# Altium PCB 0.PCB1.PcbDoc (part 9 of 12)
Units mm, origin at the board's own origin, x right, y up, seen from the top; angles counter-clockwise.
Board outline 77 x 72 mm, 6 copper layers (Top Layer, Layer 1, Layer 3, Layer 4, Layer 2, Bottom Layer), stack 1.538 mm thick; 570 components, 490 nets, 3331 pads, 1909 vias.
Unrouted connection lines stored in the file: 2.
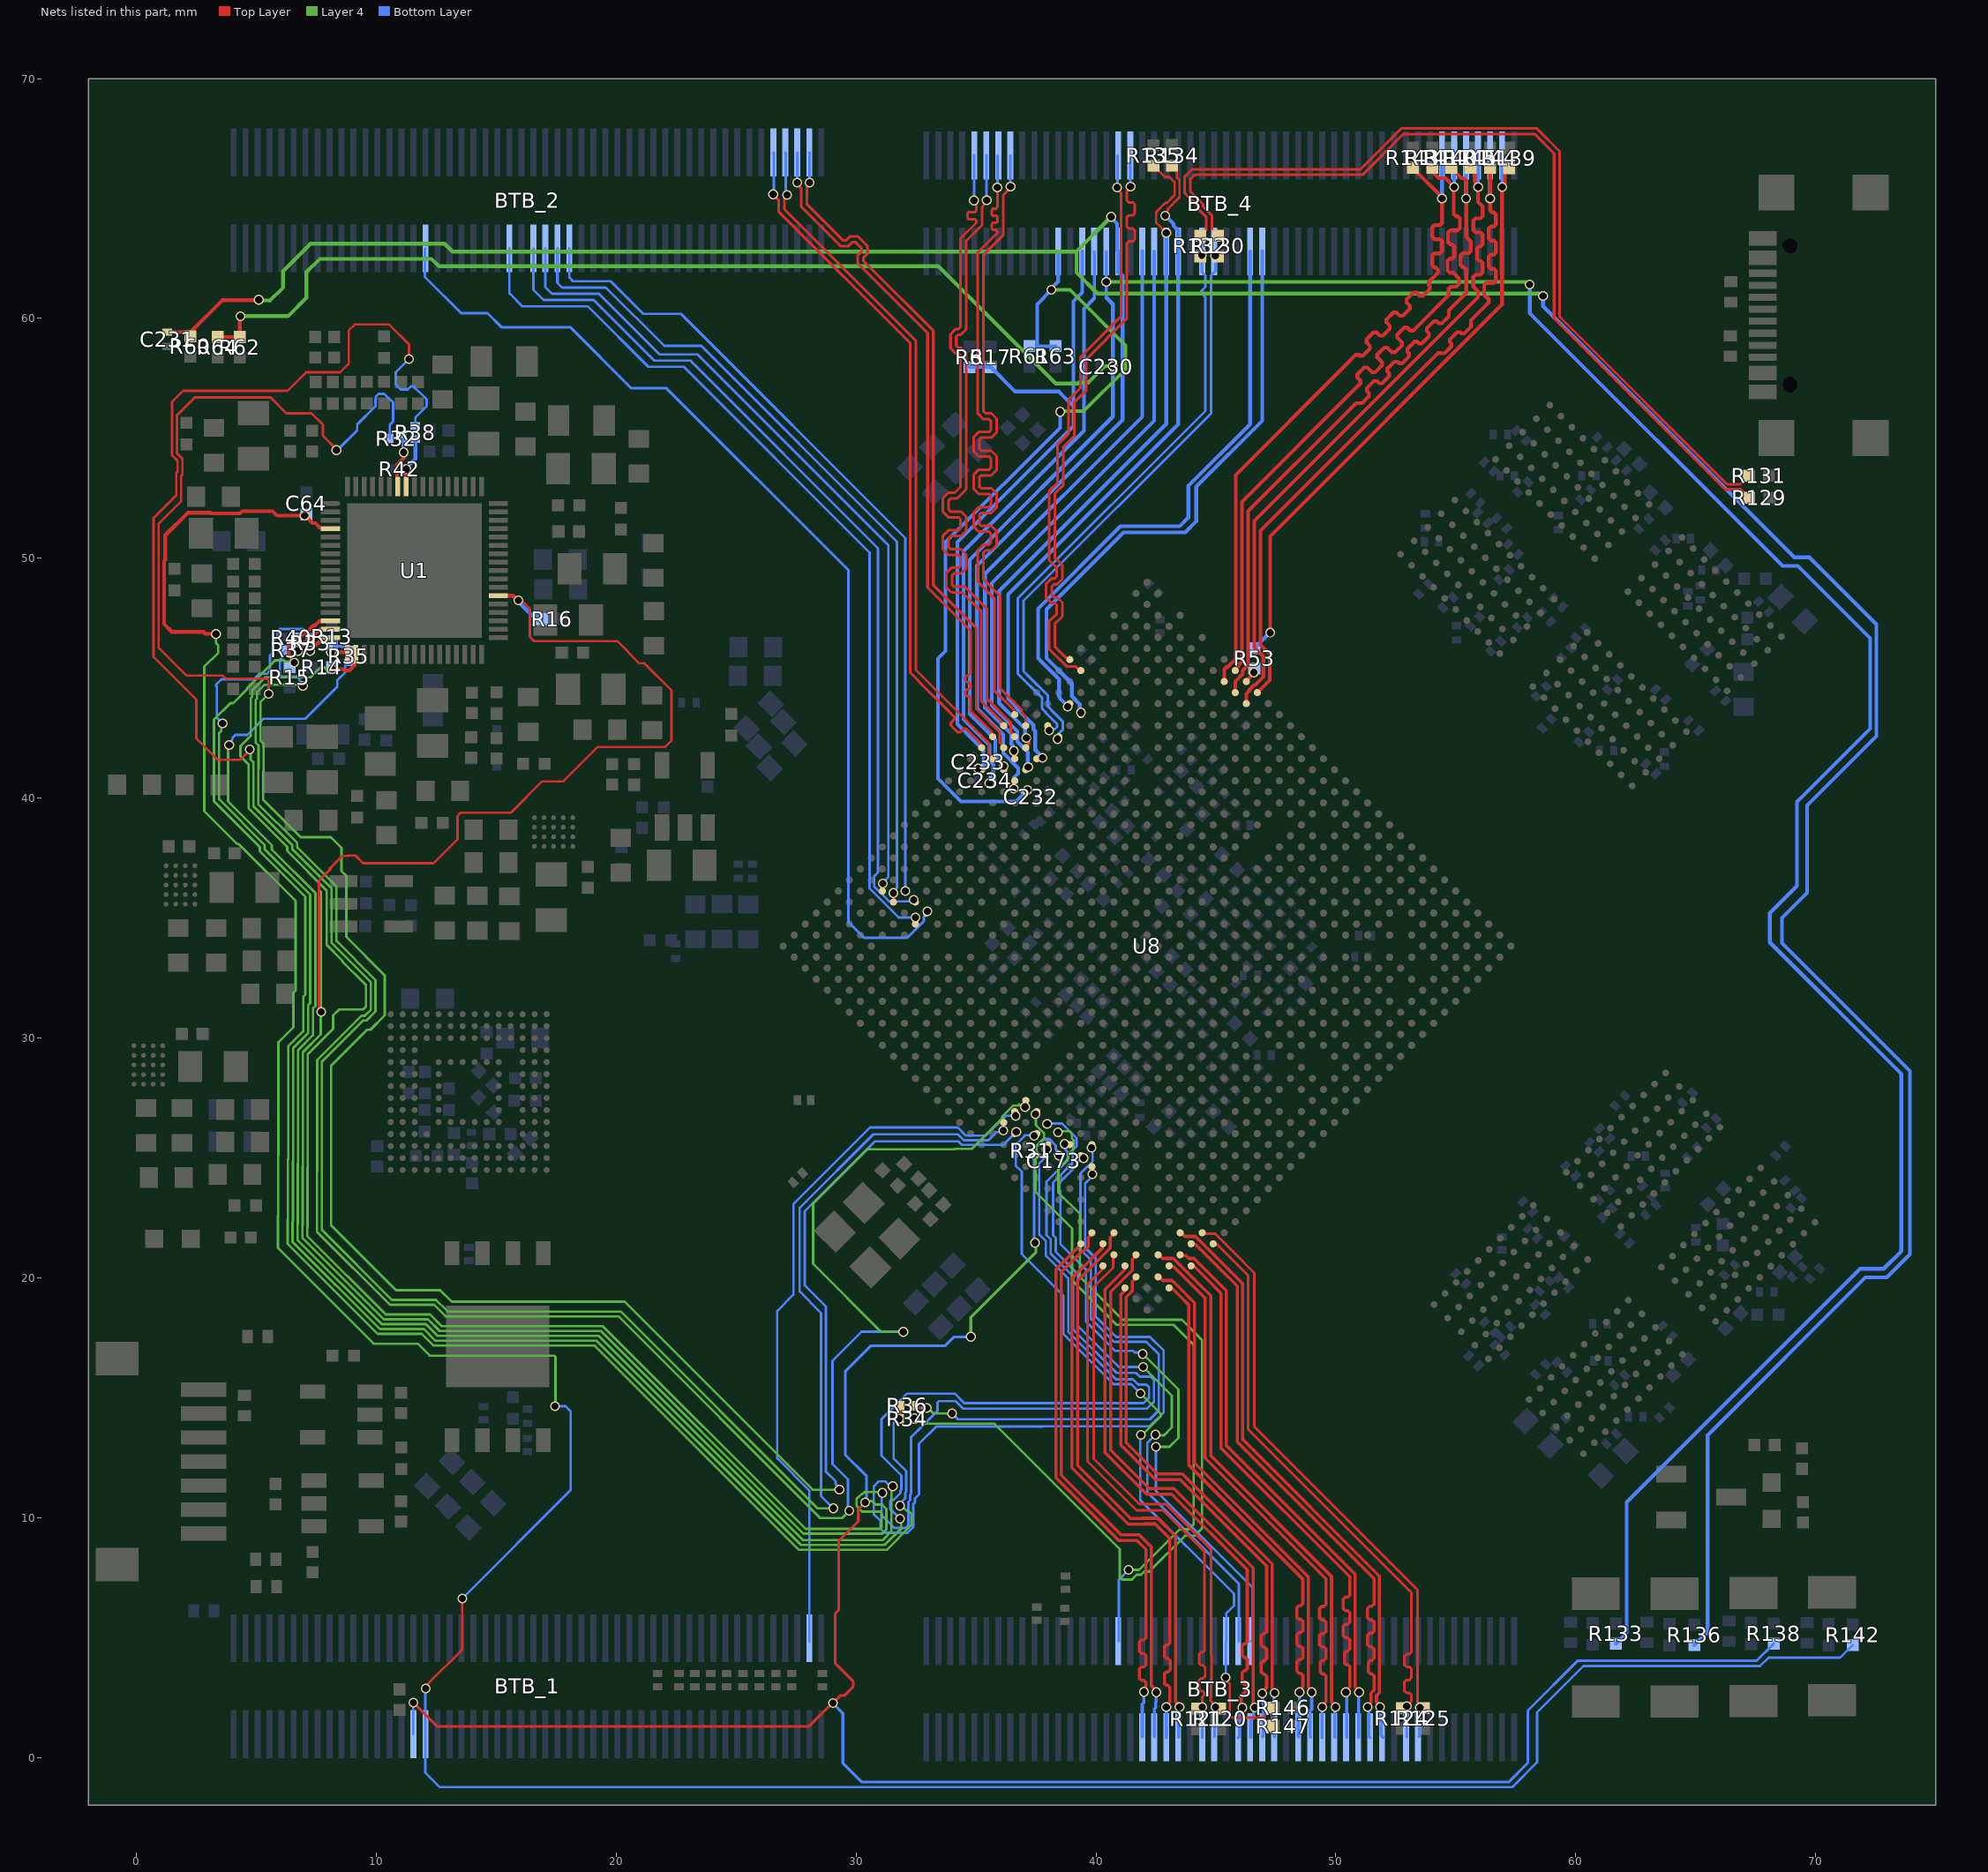
[diagram p13: the nets of this part, all layers, seen from the top]

## Via types
v1: diameter 0.41, hole 0.3, Top Layer to Bottom Layer, tented both sides, 1901 vias
v2: diameter 0.41, hole 0.3, Top Layer to Bottom Layer, 8 vias

## Nets (pads, with @x,y where several pads share a name; then routed paths per layer and width w, separated by ;. In a path a pad name is that pad's centre, name@x,y a point inside that pad or via, vN(x,y) a via of type N, cw(c..) or ccw(c..) an arc to the next point about the centre after c; other vN are vias at no path point) (continued)
PCIE30_PORT0_REF_CLKN: BTB_3.77 R121.2 U8.E34 | length 23.3
  Top Layer w0.109: U8.E34@40.292,20.497 40.256,20.46 40.256,20.331 39.816,19.891 39.648,19.723 39.648,12.348 41.69,10.305 42.808,10.305 44.531,8.583 44.531,5.436 44.531,4.461 44.449,4.38 44.377,4.38 44.296,4.298 44.296,3.92 44.377,3.839 44.47,3.839 44.551,3.758 44.551,3.379 44.47,3.298 44.377,3.298 44.296,3.217 44.296,2.838 44.377,2.757 44.449,2.757 44.531,2.676 44.531,2.622 44.432,2.523 v1(44.432,2.102)
  Bottom Layer w0.109: BTB_3.77@44.429,0.817 v1@44.429,2.095
PCIE30_PORT0_REF_CLKP: BTB_3.76 R120.2 U8.E33 | length 23.2
  Top Layer w0.109: U8.E33@40.752,20.956 40.715,20.919 40.715,20.421 40.001,19.707 39.909,19.615 39.909,12.456 41.799,10.567 42.916,10.567 44.792,8.691 44.792,4.262 44.813,4.241 44.813,3.271 44.792,3.25 44.792,2.513 44.775,2.496 44.775,2.376 44.983,2.168 v1(44.983,2.104)
  Bottom Layer w0.109: BTB_3.76@44.955,0.843 v1@44.955,2.076
PCIE30_PORT0_RX0N: BTB_3.82 U8.G34 | length 23.7
  Top Layer w0.131: U8.G34@39.373,21.416 39.373,21.378 38.328,20.333 38.328,11.671 40.95,9.049 41.707,9.049 42.082,8.673 42.082,5.068 42.082,4.983 41.998,4.899 41.9,4.899 41.816,4.814 41.816,4.42 41.9,4.336 41.998,4.336 42.082,4.252 42.082,3.858 41.998,3.773 41.9,3.773 41.816,3.689 41.816,3.295 41.9,3.211 41.998,3.211 42.082,3.126 42.082,3.061 42.082,2.948 42.056,2.922 42.056,2.785 v1(42.003,2.732)
  Bottom Layer w0.131: BTB_3.82@41.931,0.867 41.931,2.217 41.99,2.277 41.99,2.72 v1(42.003,2.732)
PCIE30_PORT0_RX0P: BTB_3.81 U8.G33 | length 23.7
  Top Layer w0.131: U8.G33@39.832,21.875 39.832,21.83 39.748,21.745 39.748,21.74 39.68,21.672 39.68,21.289 39.5,21.109 39.433,21.109 39.015,20.692 38.56,20.237 38.56,11.767 41.047,9.281 41.803,9.281 42.315,8.769 42.315,2.982 42.514,2.783 v1(42.514,2.714)
  Bottom Layer w0.131: BTB_3.81@42.431,0.867 42.431,2.01 42.49,2.07 42.49,2.286 42.514,2.309 v1(42.514,2.714)
PCIE30_PORT0_RX1N: BTB_3.80 U8.F33 | length 24.1
  Top Layer w0.131: U8.F33@40.292,21.416 40.26,21.383 40.26,21.227 39.44,20.407 39.432,20.407 39,19.976 39,12.075 41.349,9.726 42.029,9.726 42.035,9.732 42.476,9.732 43.086,9.123 43.086,5.167 43.086,4.775 43.001,4.69 42.937,4.69 42.852,4.606 42.852,4.212 42.937,4.128 43.01,4.128 43.094,4.043 43.094,3.65 43.01,3.565 42.937,3.565 42.852,3.481 42.852,3.087 42.937,3.003 43.001,3.003 43.086,2.918 43.086,2.853 43.086,2.318 42.932,2.164 v1(42.932,2.102)
  Bottom Layer w0.131: BTB_3.80@42.929,0.817 v1@42.929,2.095
PCIE30_PORT0_RX1P: BTB_3.79 U8.F32 | length 24.1
  Top Layer w0.131: U8.F32@40.752,21.875 40.751,21.829 40.599,21.677 40.599,21.237 39.535,20.173 39.239,19.877 39.239,12.174 41.448,9.965 41.93,9.965 41.936,9.971 42.575,9.971 43.324,9.222 43.324,8.935 43.327,8.933 43.327,2.32 43.483,2.163 v1(43.483,2.104)
  Bottom Layer w0.131: BTB_3.79@43.455,0.843 v1@43.455,2.076
PCIE30_PORT0_TX0N: BTB_3.74 U8.D33 | length 23.7
  Top Layer w0.131: U8.D33@41.19,20.399 41.19,20.319 40.38,19.509 40.38,12.713 42.116,10.977 43.155,10.977 46.309,7.823 46.309,4.984 46.309,4.818 46.225,4.734 46.18,4.734 46.095,4.649 46.095,4.255 46.18,4.171 46.225,4.171 46.309,4.087 46.309,3.693 46.225,3.608 46.18,3.608 46.095,3.524 46.095,3.13 46.18,3.046 46.225,3.046 46.309,2.961 46.309,2.896 46.309,2.815 46.004,2.51 46.051,2.463 46.051,2.127 v1(46.104,2.074)
  Bottom Layer w0.131: BTB_3.74@45.929,0.817 45.98,0.868 45.98,1.787 46.051,1.857 46.051,2.02 v1(46.104,2.074)
PCIE30_PORT0_TX0P: BTB_3.73 U8.D32 | length 23.7
  Top Layer w0.131: U8.D32@41.671,20.956 41.671,20.91 41.518,20.757 41.518,20.318 40.613,19.413 40.613,19.095 40.613,12.809 42.213,11.209 43.251,11.209 46.561,7.899 46.561,2.55 ; 46.562,2.549 46.562,2.137 v1(46.616,2.083)
  Bottom Layer w0.131: BTB_3.73@46.455,0.843 46.455,1.518 46.581,1.644 46.581,2.048 v1(46.616,2.083)
PCIE30_PORT0_TX1N: BTB_3.72 U8.C34 | length 22.5
  Top Layer w0.131: U8.C34@41.211,19.577 41.179,19.545 41.179,19.432 41.032,19.284 41.032,13.028 42.473,11.587 43.506,11.587 47.118,7.974 47.118,5.505 47.118,5.24 47.034,5.155 46.979,5.155 46.894,5.071 46.894,4.677 46.979,4.593 47.034,4.593 47.118,4.508 47.118,4.114 47.034,4.03 46.979,4.03 46.894,3.946 46.894,3.552 46.979,3.467 47.034,3.467 47.118,3.383 47.118,3.318 47.118,2.919 46.933,2.734 v1(46.933,2.675)
  Bottom Layer w0.131: v1(46.933,2.675) 46.935,2.674 46.935,2.29 46.988,2.237 46.988,0.916 BTB_3.72@46.935,0.863
PCIE30_PORT0_TX1P: BTB_3.71 U8.C33 | length 22.5
  Top Layer w0.131: U8.C33@41.671,20.037 41.671,19.991 41.518,19.838 41.518,19.442 41.264,19.188 41.264,13.125 42.57,11.819 43.602,11.819 47.35,8.07 47.35,2.867 47.452,2.766 v1(47.452,2.69)
  Bottom Layer w0.131: BTB_3.71@47.443,0.855 47.443,1.771 47.427,1.787 47.427,2.665 v1(47.452,2.69)
PCIE30_PORT1_REF_CLKN: BTB_3.59 R125.2 U8.B28 | length 25.1
  Top Layer w0.109: U8.B28@44.429,21.875 44.465,21.839 44.965,21.839 45.681,21.123 46.605,20.2 46.605,13.785 53.411,6.978 53.411,2.302 53.511,2.202 R125.2@53.511,2.132
  Bottom Layer w0.109: BTB_3.59@53.455,0.843 53.483,0.871 53.483,2.104 v1@53.511,2.132
  other v1: 53.511,2.081
PCIE30_PORT1_REF_CLKP: BTB_3.60 R124.2 U8.A28 | length 24.9
  Top Layer w0.109: U8.A28@44.888,21.416 44.925,21.379 45.056,21.379 46.343,20.092 46.343,13.676 53.15,6.87 53.15,4.987 53.15,4.392 53.069,4.31 52.943,4.31 52.862,4.229 52.862,3.851 52.943,3.77 53.069,3.77 53.15,3.689 53.15,3.31 53.069,3.229 52.943,3.229 52.862,3.148 52.862,2.769 52.943,2.688 53.069,2.688 53.15,2.607 53.15,2.344 53.093,2.288 52.96,2.154 v1(52.96,2.13)
  Bottom Layer w0.109: BTB_3.60@52.955,0.843 52.957,0.845 52.957,2.123 v1@52.955,2.125
PCIE30_PORT1_RX0N: BTB_3.69 U8.A32 | length 22.1
  Top Layer w0.131: U8.A32@43.049,19.577 43.082,19.545 43.187,19.545 43.645,19.087 43.713,19.019 43.878,18.854 43.878,12.18 48.627,7.431 48.627,7.034 48.627,6.406 48.542,6.321 48.457,6.321 48.373,6.237 48.373,5.843 48.457,5.759 48.542,5.759 48.627,5.674 48.627,5.281 48.542,5.196 48.457,5.196 48.373,5.112 48.373,4.718 48.457,4.634 48.542,4.634 48.627,4.549 48.627,4.155 48.542,4.071 48.457,4.071 48.373,3.987 48.373,3.593 48.457,3.508 48.542,3.508 48.627,3.424 48.627,2.931 48.503,2.807 48.487,2.791 v1(48.487,2.716)
  Bottom Layer w0.131: BTB_3.69@48.455,0.843 48.435,0.862 48.435,2.151 48.493,2.209 48.493,2.71 v1(48.487,2.716)
PCIE30_PORT1_RX0P: BTB_3.68 U8.B32 | length 22.1
  Top Layer w0.131: U8.B32@42.59,20.037 42.636,20.037 42.788,19.884 43.177,19.884 43.356,19.704 43.741,19.319 43.809,19.251 44.11,18.951 44.11,12.276 48.859,7.527 48.859,7.034 48.859,2.931 48.999,2.791 v1(48.999,2.716)
  Bottom Layer w0.131: BTB_3.68@48.955,0.843 48.935,0.862 48.935,1.944 48.993,2.002 48.993,2.71 v1(48.999,2.716)
PCIE30_PORT1_RX1N: BTB_3.67 U8.B31 | length 23.5
  Top Layer w0.131: U8.B31@43.05,20.496 43.082,20.464 43.239,20.464 44.062,19.64 44.13,19.572 44.553,19.149 44.553,12.483 49.59,7.447 49.59,7.004 49.59,6.376 49.505,6.292 49.408,6.292 49.324,6.207 49.324,5.813 49.408,5.729 49.505,5.729 49.59,5.645 49.59,5.251 49.505,5.166 49.408,5.166 49.324,5.082 49.324,4.688 49.408,4.604 49.505,4.604 49.59,4.519 49.59,4.126 49.505,4.041 49.438,4.041 49.353,3.957 49.353,3.563 49.438,3.479 49.505,3.479 49.59,3.394 49.59,3.206 49.59,2.318 49.432,2.16 v1(49.432,2.102)
  Bottom Layer w0.131: BTB_3.67@49.429,0.817 v1@49.429,2.095
PCIE30_PORT1_RX1P: BTB_3.66 U8.C31 | length 23.4
  Top Layer w0.131: U8.C31@42.59,20.956 42.636,20.956 42.789,20.803 43.228,20.803 44.295,19.737 44.786,19.245 44.786,12.58 49.822,7.543 49.822,7.004 49.822,2.32 49.983,2.159 v1(49.983,2.104)
  Bottom Layer w0.131: BTB_3.66@49.955,0.843 v1@49.955,2.076
PCIE30_PORT1_TX0N: BTB_3.65 U8.A30 | length 23.5
  Top Layer w0.131: U8.A30@43.969,20.497 44.001,20.464 44.106,20.464 44.496,20.074 44.564,20.006 45.206,19.364 45.206,12.909 50.581,7.534 50.581,7.392 50.581,6.764 50.496,6.68 50.397,6.68 50.312,6.596 50.312,6.202 50.397,6.117 50.496,6.117 50.581,6.033 50.581,5.639 50.496,5.555 50.397,5.555 50.312,5.47 50.312,5.077 50.397,4.992 50.496,4.992 50.581,4.908 50.581,4.514 50.496,4.43 50.44,4.43 50.356,4.345 50.356,3.951 50.44,3.867 50.496,3.867 50.581,3.783 50.581,3.414 50.581,2.932 50.421,2.772 v1(50.421,2.716)
  Bottom Layer w0.131: v1(50.421,2.716) 50.455,2.682 BTB_3.65@50.455,0.843
PCIE30_PORT1_TX0P: BTB_3.64 U8.B30 | length 23.5
  Top Layer w0.131: U8.B30@43.509,20.956 43.542,20.924 43.755,20.924 43.875,20.803 44.096,20.803 44.729,20.17 45.439,19.461 45.439,13.005 50.813,7.631 50.813,7.392 50.813,2.932 50.972,2.772 v1(50.972,2.716)
  Bottom Layer w0.131: BTB_3.64@50.955,0.843 50.952,0.846 50.952,2.695 v1(50.972,2.716)
PCIE30_PORT1_TX1N: BTB_3.63 U8.B29 | length 24.9
  Top Layer w0.131: U8.B29@43.969,21.416 44.001,21.383 44.158,21.383 45.05,20.492 45.122,20.419 45.889,19.652 45.889,13.155 51.59,7.455 51.59,7.008 51.59,6.38 51.505,6.296 51.409,6.296 51.324,6.211 51.324,5.817 51.409,5.733 51.505,5.733 51.59,5.649 51.59,5.255 51.505,5.17 51.409,5.17 51.324,5.086 51.324,4.692 51.409,4.608 51.505,4.608 51.59,4.523 51.59,4.13 51.505,4.045 51.435,4.045 51.351,3.961 51.351,3.567 51.435,3.483 51.505,3.483 51.59,3.398 51.59,3.219 51.59,2.798 51.465,2.673 51.465,2.315 51.327,2.177 v1(51.327,2.102)
  Bottom Layer w0.131: v1(51.327,2.102) 51.379,2.05 51.379,0.868 BTB_3.63@51.429,0.817
PCIE30_PORT1_TX1P: BTB_3.62 U8.C29 | length 24.9
  Top Layer w0.131: U8.C29@43.509,21.875 43.555,21.875 43.708,21.722 44.148,21.722 45.214,20.656 45.355,20.515 46.122,19.748 46.122,13.251 51.822,7.551 51.822,7.008 51.822,2.702 51.697,2.577 51.697,2.32 51.838,2.179 v1(51.838,2.104)
  Bottom Layer w0.131: v1(51.838,2.104) 51.885,2.057 51.885,0.913 BTB_3.62@51.955,0.843
PCIE30X1_0_CLKREQN_M0: BTB_1.49 U8.T31 | length 30.1
  Bottom Layer w0.102: BTB_1.49@28.051,4.843 28.051,11.131 26.715,12.467 26.715,18.616 27.388,19.289 27.388,23.066 30.583,26.261 33.446,26.261 34.24,26.261 34.575,25.926 35.409,25.926 36.237,26.754 v1(36.65,26.754)
PCIE30X1_0_PERSTN_M0: BTB_3.27 U8.P30 | length 27.8
  Layer 4 w0.102: v1(41.97,16.279) 43.167,15.083 43.167,13.758 42.841,13.433 42.504,13.433 v1(42.479,13.458)
  Bottom Layer w0.102: v1(37.968,26.413) 37.987,26.432 38.581,26.432 39.186,25.827 39.186,25.476 39.013,25.302 39.013,25.218 39.035,25.195 39.035,24.917 39.013,24.895 39.013,24.767 38.216,23.97 38.216,21.768 38.322,21.662 38.322,21.081 39.253,20.15 39.253,17.985 40.959,16.279 v1(41.97,16.279) ; v1(42.479,13.458) 42.141,13.12 42.141,11.053 45.955,7.239 BTB_3.27@45.955,4.843
PCIE30X1_0_WAKEN_M0: BTB_3.17 U8.R30 | length 28.2
  Layer 4 w0.102: v1(37.475,26.819) 37.499,26.794 37.499,26.364 37.835,26.028 37.835,25.811 37.476,25.452 37.476,23.584 39.006,22.054 39.006,19.894 40.865,18.034 41.673,18.034 42.593,18.034 43.243,18.034 44.073,17.204 44.073,9.718 43.868,9.513 43.494,9.513 ; v1(41.367,7.817) 41.799,7.817 43.494,9.513 ; 43.492,9.515 43.494,9.513
  Bottom Layer w0.102: BTB_3.17@40.955,4.843 40.955,7.405 v1(41.367,7.817)
PCIE30X2_CLKREQN_M1: BTB_2.73 U8.AL27 | length 35.2
  Top Layer w0.127: U8.AL27@31.559,35.664 v1(31.559,36.041)
  Bottom Layer w0.102: 17.546,61.491 17.749,61.288 19.57,61.288 22.006,58.852 23.547,58.852 31.706,50.693 31.706,39.66 31.706,36.255 31.559,36.107 v1(31.559,36.041)
  Bottom Layer w0.114: 17.546,61.491 17.551,61.497 BTB_2.73@17.551,62.92
PCIE30X2_PERSTN_M1: BTB_2.75 U8.AK26 | length 36.6
  Bottom Layer w0.102: 16.551,61.69 16.551,61.19 16.977,60.765 19.059,60.765 21.584,58.24 23.093,58.24 30.914,50.419 30.914,38.867 30.914,36.896 30.756,36.739 30.756,36.312 31.374,35.694 32.339,35.694 v1(32.398,35.753)
  Bottom Layer w0.114: 16.551,61.69 BTB_2.75@16.551,62.92
PCIE30X2_WAKEN_M1: BTB_2.74 U8.AM27 | length 34.6
  Bottom Layer w0.102: 17.051,61.606 17.051,61.3 17.325,61.026 19.283,61.026 21.81,58.499 23.385,58.499 31.351,50.534 31.351,39.304 31.351,36.714 31.118,36.482 v1(31.118,36.441)
  Bottom Layer w0.114: 17.051,61.606 BTB_2.74@17.051,62.92
PCIE30X4_CLKREQN_M1: BTB_2.72 U8.AL26 | length 34.4
  Bottom Layer w0.102: BTB_2.72@18.051,62.92 18.051,61.697 18.196,61.552 19.767,61.552 21.13,60.189 22.701,60.189 32.053,50.837 v1(32.053,36.123)
PCIE30X4_PERSTN_M1: BTB_2.77 U8.AJ27 | length 37.8
  Bottom Layer w0.102: BTB_2.77@15.551,62.92 15.551,61.047 16.098,60.501 18.826,60.501 21.343,57.983 22.816,57.983 30.563,50.236 30.563,38.517 30.563,36.232 31.774,35.021 v1(32.479,35.021)
PCIE30X4_WAKEN_M1: BTB_2.84 U8.AJ26 | length 42.8
  Bottom Layer w0.114: BTB_2.84@12.051,62.92 12.028,62.897 12.028,61.729 13.537,60.219 14.638,60.219 15.222,59.634 18.087,59.634 20.636,57.086 22.099,57.086 29.679,49.505 29.679,37.633 29.679,34.825 30.331,34.174 32.131,34.174 32.833,34.875 32.833,35.047 32.979,35.193 v1(32.979,35.273)
PMIC_INT: R14.2 U1.19 U8.M30 | length 95.3
  Top Layer w0.156: v1(8.161,45.371) 8.628,45.371 8.679,45.32 8.876,45.32 9.119,45.562 9.119,45.967 U1.19@9.14,45.988
  Layer 4 w0.102: v1(8.161,45.371) 8.159,45.373 7.912,45.373 7.835,45.45 7.677,45.45 7.263,45.037 5.364,45.037 4.827,44.5 4.827,44.228 4.766,44.166 4.766,42.591 4.341,42.166 4.341,41.743 4.674,41.41 4.674,39.579 6.283,37.97 6.283,37.794 7.934,36.142 7.934,33.873 8.586,33.222 8.586,33.187 9.57,32.202 9.57,31.308 9.449,31.187 8.451,31.187 8.202,30.939 8.202,30.375 7.143,29.316 7.143,24.594 7.132,24.582 7.132,22.092 7.121,22.082 7.121,21.745 10.399,18.467 12.239,18.467 12.726,17.981 19.443,17.981 27.897,9.527 31.005,9.527 31.065,9.587 31.065,10.192 31.005,10.251 30.252,10.251 30.024,10.479 30.024,10.775 30.233,10.984 30.262,10.984 30.34,11.062 31.064,11.062 v1(31.096,11.03)
  Bottom Layer w0.102: v1(31.096,11.03) 31.074,11.008 31.074,10.087 31.595,9.566 32.066,9.566 32.186,9.686 32.186,10.651 32.258,10.723 32.258,10.952 32.292,10.986 32.292,13.345 33.398,14.45 33.398,14.795 33.457,14.854 34.144,14.854 34.455,14.543 42.129,14.543 42.419,14.833 42.419,15.749 42.29,15.878 41.828,15.878 41.676,16.03 40.861,16.03 39.05,17.841 39.05,20.066 38.119,20.996 38.119,21.592 37.939,21.772 37.939,24.009 38.82,24.889 38.82,24.975 38.842,24.997 38.842,25.115 38.82,25.138 38.82,25.244 38.753,25.31 38.753,25.517 v1(38.694,25.576)
PMIC_PWR_CTRL1: R32.2 U1.62 | length 2.1
  Top Layer w0.156: U1.62@10.89,52.989 10.869,53.01 10.869,53.53 10.848,53.55 10.848,53.885 11.153,54.191 11.153,54.409 v1(11.146,54.416)
  Bottom Layer w0.102: R32.2@11.115,54.989 11.109,54.983 11.109,54.542 v1@11.145,54.506
PMIC_PWR_CTRL1_R: R32.1 U8.R32 | length 104
  Top Layer w0.102: v1(5.516,44.342) 5.516,44.895 5.43,44.981 3.727,44.981 3.602,45.106 2.09,45.106 0.922,46.274 0.922,51.426 1.86,52.364 1.86,53.426 1.92,53.485 1.92,54.148 1.688,54.379 1.688,55.96 2.433,56.704 5.598,56.704 6.257,56.046 7.299,56.046 7.615,55.73 7.654,55.691 7.655,55.69 7.658,55.69 7.719,55.629 7.719,55.618 7.778,55.559 7.778,55.104 8.337,54.545 v1(8.337,54.506)
  Layer 4 w0.102: v1(5.516,44.342) 5.172,43.998 5.172,42.402 5.299,42.275 5.299,41.126 5.284,41.11 5.284,39.933 6.849,38.368 8.106,38.368 8.554,37.92 8.554,36.95 8.747,36.757 8.747,34.21 10.355,32.602 10.355,30.94 9.754,30.339 9.614,30.339 8.119,28.843 8.119,22.185 10.82,19.483 12.66,19.483 13.146,18.997 20.356,18.997 28.192,11.161 v1(29.304,11.161)
  Bottom Layer w0.102: v1(8.337,54.506) 8.376,54.506 9.201,55.331 9.201,55.575 9.967,56.341 9.967,56.625 9.981,56.64 9.981,56.744 10.093,56.856 10.337,56.856 10.697,56.496 10.697,56.446 10.699,56.444 10.699,55.703 10.565,55.57 R32.1@10.565,54.989 ; v1(29.304,11.161) 29.304,11.245 29.149,11.399 29.149,11.508 28.747,11.91 28.747,18.794 27.864,19.676 27.864,22.766 30.786,25.687 34.268,25.687 34.415,25.54 36.141,25.54 36.682,26.081 v1(36.682,26.085)
PMIC_PWR_CTRL2: R38.2 R42.2 U1.61 | length 2.1
  Top Layer w0.156: U1.61@11.24,52.989 11.247,52.995 11.247,53.712 v1(11.253,53.718)
  Bottom Layer w0.156: v1(11.253,53.718) 11.253,53.768 11.627,54.143 11.627,54.938 R38.2@11.602,54.963
PMIC_PWR_CTRL2_R: R38.1 U8.T30 | length 113.9
  Top Layer w0.102: v1(4.719,42.029) 4.719,41.985 4.327,41.593 3.4,41.593 2.501,42.492 2.501,44.102 0.719,45.885 0.719,51.675 1.657,52.613 1.657,53.55 1.716,53.609 1.716,54.064 1.485,54.295 1.485,56.515 1.947,56.978 6.301,56.978 7.073,57.75 7.162,57.75 ; 7.162,57.751 7.943,57.751 7.949,57.757 8.321,57.757 8.327,57.751 8.494,57.751 8.849,58.105 8.849,59.5 9.095,59.746 10.536,59.746 11.361,58.922 v1(11.361,58.311)
  Layer 4 w0.102: v1(4.719,42.029) 4.764,41.983 4.764,41.608 4.877,41.495 4.877,39.663 6.5,38.041 6.5,37.864 8.137,36.227 8.137,33.958 9.776,32.319 9.776,31.18 9.514,30.918 9.374,30.918 7.539,29.083 7.539,24.429 7.528,24.418 7.528,21.914 10.568,18.874 12.408,18.874 12.894,18.387 20.103,18.387 28.511,9.98 29.418,9.98 v1(29.723,10.286) ; v1(31.973,17.743) 31.041,17.743 28.208,20.575 28.208,23.082 30.486,25.359 34.114,25.359 34.124,25.37 34.219,25.37 34.224,25.374 34.832,25.374 36.103,26.645 36.103,26.726 36.556,27.179 36.75,27.179 36.8,27.229 36.851,27.179 36.991,27.179 v1(37.05,27.12)
  Bottom Layer w0.102: v1(11.361,58.311) 10.81,57.76 10.81,57.245 11.019,57.036 11.315,57.036 11.455,57.176 11.539,57.176 11.783,56.931 11.798,56.931 12.1,56.629 12.1,56.333 11.627,55.861 R38.1@11.627,55.518 ; v1(29.723,10.286) 29.664,10.345 29.664,10.496 29.661,10.499 29.661,11.584 29.019,12.227 29.019,16.541 30.228,17.75 31.917,17.75 v1@31.95,17.783
PMIC_PWR_CTRL3: R37.2 R40.2 U1.16 | length 2.3
  Top Layer w0.156: v1(6.737,46.138) 6.737,46.195 7.145,46.602 7.213,46.602 7.627,47.017 8.069,47.017 U1.16@8.09,47.039
  Bottom Layer w0.156: R40.2@6.735,46.696 6.735,46.14 v1(6.737,46.138)
PMIC_PWR_CTRL3_R: R37.1 U8.T32 | length 79.2
  Layer 4 w0.102: v1(6.94,44.679) 6.9,44.719 5.334,44.719 5.031,44.416 5.031,44.144 4.969,44.082 4.969,42.318 5.096,42.191 5.096,41.21 5.081,41.195 5.081,39.747 6.703,38.125 6.703,37.948 8.341,36.311 8.341,34.042 9.969,32.414 9.969,31.1 9.594,30.725 9.454,30.725 7.732,29.003 7.732,21.996 10.652,19.077 12.492,19.077 12.978,18.591 20.187,18.591 28.394,10.384 v1(29.057,10.384)
  Bottom Layer w0.102: R37.1@6.213,46.15 6.082,46.018 6.082,45.882 5.981,45.782 5.981,45.508 5.981,45.155 6.07,45.066 6.689,45.066 6.791,44.964 6.791,44.912 6.94,44.763 v1(6.94,44.679) ; v1(29.057,10.384) 28.544,10.897 28.544,18.527 27.652,19.419 27.652,22.914 30.72,25.982 33.725,25.982 34.246,25.982 34.495,25.733 35.521,25.733 35.863,26.075 36.077,26.075 v1(36.143,26.142)
PMIC_SPI_CLK: R33.2 U1.17 | length 1.1
  Top Layer w0.156: v1(7.249,46.138) 7.249,46.147 7.768,46.667 8.069,46.667 U1.17@8.09,46.689
PMIC_SPI_CLK_R: R33.1 U8.N31 | length 92.2
  Layer 4 w0.102: v1(3.593,43.113) 3.534,43.054 3.534,42.79 3.449,42.705 3.449,39.942 5.354,38.037 5.354,37.861 7.242,35.972 7.242,31.445 7.158,31.361 7.158,30.193 6.534,29.568 6.534,24.846 6.522,24.835 6.522,22.345 6.512,22.335 6.512,21.493 10.147,17.858 11.987,17.858 12.473,17.371 19.19,17.371 27.706,8.856 31.196,8.856 31.879,9.539 31.879,9.897 v1(31.829,9.947)
  Bottom Layer w0.102: v1(3.593,43.113) 3.352,43.354 3.352,44.633 3.331,44.655 3.331,44.739 3.543,44.951 4.884,44.951 5.112,45.179 5.44,45.179 5.575,45.314 5.575,45.95 5.675,46.051 5.675,46.515 5.879,46.718 5.879,46.959 5.968,47.048 6.944,47.048 7.033,46.959 7.033,46.912 7.204,46.742 R33.1@7.254,46.742 ; v1(31.829,9.947) 31.421,10.355 31.421,10.685 31.48,10.745 31.571,10.745 31.852,11.026 31.852,11.12 31.886,11.154 31.886,11.756 31.063,12.578 31.063,14.1 32.133,15.169 34.117,15.169 34.51,14.776 41.991,14.776 42.216,15.001 42.216,15.434 42.106,15.544 41.771,15.544 41.549,15.766 40.837,15.766 38.846,17.757 38.846,19.981 37.916,20.912 37.916,21.522 37.639,21.799 37.639,24.769 37.892,25.023 37.892,25.298 v1(37.951,25.357)
PMIC_SPI_CS: R13.2 R35.2 U1.18 | length 1.4
  Top Layer w0.156: v1(8.116,46.084) 8.769,46.084 8.79,46.062 U1.18@8.79,45.988
  Bottom Layer w0.102: R13.2@8.224,46.327 8.564,46.327 8.596,46.295 8.76,46.295 R35.2@8.859,46.196
PMIC_SPI_CS_R: R35.1 U8.K30 | length 92.3
  Layer 4 w0.102: v1(3.866,42.213) 3.823,42.171 3.823,39.855 5.643,38.036 5.643,37.859 7.462,36.04 7.462,31.327 7.361,31.226 7.361,30.108 6.737,29.484 6.737,24.762 6.725,24.75 6.725,22.261 6.715,22.25 6.715,21.577 10.231,18.061 12.071,18.061 12.557,17.575 19.274,17.575 27.79,9.059 31.112,9.059 31.471,9.418 31.471,11.245 v1(31.529,11.302)
  Bottom Layer w0.102: v1(3.866,42.213) 3.866,42.297 4.001,42.432 4.001,42.512 4.126,42.637 4.627,42.637 5.298,43.308 7.037,43.308 8.375,44.646 8.375,44.912 8.71,45.246 8.71,45.547 8.728,45.565 R35.1@8.916,45.565 ; v1(31.529,11.302) 31.445,11.302 31.346,11.401 31.325,11.401 31.217,11.509 30.957,11.509 30.738,11.291 30.738,10.135 31.02,9.853 31.02,9.525 31.183,9.363 32.151,9.363 32.389,9.602 32.389,10.567 32.462,10.639 32.462,10.804 32.628,10.971 32.628,13.074 33.349,13.795 37.793,13.795 37.805,13.807 42.249,13.807 42.825,14.383 42.825,16.956 42.252,17.529 40.845,17.529 39.991,18.383 39.991,20.812 39.55,21.253 39.55,23.928 39.849,24.227 v1(39.849,24.317)
PMIC_SPI_MOSI: R15.2 R34.2 R36.2 U1.15 | length 68.6
  Top Layer w0.102: R34.2@31.859,14.123 R34.2@31.869,14.113 ; R34.2@31.866,14.232 31.866,14.793 R36.2@31.868,14.794
  Top Layer w0.156: v1(6.577,45.647) 6.577,45.715 6.352,45.94 6.352,46.322 6.578,46.547 6.661,46.547 6.975,46.861 7.053,46.861 7.377,47.184 7.43,47.184 7.612,47.367 8.069,47.367 U1.15@8.09,47.389
  Layer 4 w0.102: v1(6.577,45.647) 6.522,45.701 6.2,45.701 6.158,45.743 5.783,45.743 4.624,44.585 4.624,44.546 4.042,43.964 3.924,43.964 3.236,43.276 3.236,39.868 5.15,37.953 5.15,37.777 7.039,35.888 7.039,31.802 6.955,31.718 6.955,30.277 6.33,29.653 6.33,24.93 6.319,24.919 6.319,22.429 6.309,22.419 6.309,21.409 10.063,17.655 11.903,17.655 12.389,17.168 19.106,17.168 27.621,8.653 31.281,8.653 32.316,9.688 32.316,10.153 32.189,10.28 32.117,10.28 31.899,10.497 v1(31.829,10.497)
  Bottom Layer w0.102: v1@31.79,14.174 31.569,13.953 31.569,12.457 32.089,11.936 32.089,11.07 32.055,11.036 32.055,10.807 31.829,10.581 v1(31.829,10.497)
  other v1: 31.791,14.12
PMIC_SPI_MOSI_R1: R34.1 U8.N30 | length 37.7
  Top Layer w0.102: R34.1@32.408,14.115 32.408,14.12 v1(32.423,14.136)
  Layer 4 w0.102: v1@32.43,14.245 32.763,13.912 35.765,13.912 40.99,8.687 40.99,7.516 41.091,7.415 41.498,7.415 41.697,7.614 41.883,7.614 42.014,7.745 42.217,7.745 43.713,9.241 44.114,9.241 44.424,9.551 44.424,17.404 43.583,18.245 42.803,18.245 41.462,18.245 41.112,18.245 39.331,20.026 39.331,22.655 38.44,23.546 38.44,24.56 38.82,24.94 38.82,24.975 38.831,24.986 38.831,25.143 38.879,25.191 38.896,25.191 39.061,25.356 39.061,25.744 38.993,25.813 38.993,26.017 38.899,26.111 38.462,26.111 v1(38.417,26.065)
PMIC_SPI_MOSI_R2: R36.1 U8.L29 | length 23.9
  Top Layer w0.102: R36.1@32.415,14.664 32.515,14.565 v1(32.946,14.565)
  Layer 4 w0.102: v1@32.979,14.544 33.019,14.544 33.225,14.339 v1(34.002,14.339)
  Bottom Layer w0.102: v1(34.002,14.339) 34.241,14.1 42.255,14.1 42.622,14.467 42.622,16.807 42.103,17.326 40.761,17.326 39.788,18.299 39.788,20.742 39.357,21.173 39.357,24.345 39.634,24.622 39.643,24.622 39.858,24.837 39.858,25.375 v1(39.815,25.418)
PWR_ON: BTB_1.84 C64.2 R142.2 U1.4 | length 138.6
  Top Layer w0.102: v1@12.085,2.995 12.087,2.995 12.175,3.083 12.175,3.086 13.583,4.494 v1(13.583,6.627)
  Top Layer w0.156: v1(3.316,46.839) 3.306,46.849 2.877,46.849 2.798,46.927 1.475,46.927 1.152,47.249 1.152,49.889 1.203,49.94 1.203,50.955 2.145,51.898 3.093,51.898 3.123,51.868 4.311,51.868 4.407,51.964 5.68,51.964 5.869,51.775 v1(7.013,51.775) 7.035,51.775 7.349,51.46 7.46,51.46 7.66,51.26 8.069,51.26 U1.4@8.09,51.239
  Layer 4 w0.102: v1(3.316,46.839) 3.316,46.457 3.413,46.36 3.413,46.061 2.83,45.478 2.83,39.453 4.203,38.08 4.272,38.08 6.633,35.72 6.633,31.97 6.548,31.886 6.548,30.445 5.924,29.821 5.924,25.099 5.912,25.087 5.912,22.597 5.902,22.587 5.902,21.24 9.894,17.248 11.734,17.248 12.231,16.752 17.41,16.752 17.469,16.692 17.469,14.656 v1(17.454,14.641)
  Bottom Layer w0.102: v1@12.044,2.858 12.044,0.988 12.048,0.984 12.048,-0.639 12.651,-1.241 57.353,-1.241 58.389,-0.205 58.389,1.877 60.319,3.808 67.685,3.808 68.041,4.163 71.032,4.163 R142.2@71.555,4.686 ; v1(13.583,6.627) 18.104,11.148 18.104,14.425 17.889,14.641 v1(17.454,14.641)
  other v1: 12.058,2.872
RECOVERY_KEY: BTB_4.84 C231.1 R60.1 R136.2 U8.AL16 | length 160.5
  Top Layer w0.156: C231.1@1.29,59.429 2.075,59.429 2.153,59.351 R60.1@2.153,59.281 ; R60.1@2.306,59.485 3.578,60.757 5.075,60.757 v1(5.1,60.781)
  Layer 4 w0.156: v1(5.1,60.781) 5.134,60.747 5.54,60.747 5.557,60.73 6.116,61.288 6.116,61.974 7.259,63.117 12.847,63.117 13.177,62.787 39.186,62.787 ; v1(40.634,64.234) 39.186,62.787 ; v1(58.643,60.932) 58.574,60.932 58.473,61.034 40.063,61.034 39.186,61.91 39.186,62.787
  Bottom Layer w0.156: v1(36.585,40.394) 36.585,40.85 36.765,41.03 36.765,41.249 36.138,41.875 36.138,42.644 35.046,43.737 35.046,49.695 41.115,55.764 41.115,61.78 41.023,61.871 40.978,61.871 40.931,61.918 BTB_4.84@40.931,62.793 40.884,62.84 40.884,63.945 40.634,64.195 v1(40.634,64.234) ; v1(58.643,60.932) 58.643,60.511 69.118,50.036 69.743,50.036 72.535,47.243 72.535,42.58 69.647,39.692 69.647,36.047 68.6,34.999 68.6,33.958 73.934,28.624 73.934,20.978 72.968,20.013 72.079,20.013 65.501,13.434 65.501,5.236 R136.2@64.951,4.686
RESETn: BTB_1.85 C173.2 R16.2 R31.1 R138.2 U1.40 U8.M31 | length 179.6
  Top Layer w0.102: v1(7.708,31.082) 7.614,31.176 7.614,36.563 8.098,37.047 8.043,37.047 8.583,37.587 8.816,37.587 8.834,37.606 9.13,37.606 9.451,37.285 12.387,37.285 13.383,38.281 13.383,39.254 13.517,39.388 15.605,39.388 16.916,40.699 17.805,40.699 19.237,42.131 22.044,42.131 22.306,42.393 22.306,44.49 21.174,45.621 20.97,45.621 20.045,46.546 16.571,46.546 16.399,46.718 16.399,47.897 v1@16.05,48.246
  Top Layer w0.114: v1@11.571,2.258 12.536,1.293 28.036,1.293 29.001,2.258 v1(29.035,2.258) 29.358,2.581 29.523,2.581 29.88,2.938 29.88,3.172 29.137,3.915 29.137,6.001 29.278,6.142 29.278,9.022 30.096,9.84 30.096,10.336 30.381,10.621 v1(30.381,10.627)
  Top Layer w0.156: U1.40@15.091,48.439 15.696,48.439 15.888,48.246 v1(15.923,48.246) ; v1@15.97,48.246 v1@16.05,48.246
  Layer 4 w0.102: 7.688,36.101 7.688,30.148 6.94,29.4 6.94,24.678 6.928,24.666 6.928,22.176 6.918,22.166 6.918,21.661 10.315,18.264 12.155,18.264 12.641,17.778 19.359,17.778 27.813,9.323 31.089,9.323 31.268,9.502 31.268,10.354 31.086,10.536 30.813,10.536 30.661,10.688 30.659,10.686 30.44,10.686 v1(30.381,10.627)
  Layer 4 w0.114: v1(34.788,17.54) 34.788,18.35 37.502,21.064 37.502,21.42 v1(37.467,21.456)
  Bottom Layer w0.102: BTB_1.85@11.535,0.98 v1@11.535,2.282
  Bottom Layer w0.114: v1(29.035,2.258) 29.035,2.249 29.454,1.831 29.454,-0.248 30.238,-1.032 57.207,-1.032 58.008,-0.231 58.008,1.954 60.091,4.036 67.552,4.036 R138.2@68.253,4.737 ; v1(30.381,10.627) 30.438,10.684 30.438,10.837 30.442,10.842 30.442,11.721 29.547,12.617 29.547,16.091 30.624,17.168 33.718,17.168 34.083,17.533 34.781,17.533 v1(34.788,17.54) ; v1(37.467,21.456) 37.429,21.493 37.429,24.87 37.44,24.881 37.44,25.066 R31.1@37.476,25.102 ; R31.1@37.51,25.22 37.511,25.221 37.511,25.45 37.84,25.779 38.057,25.779 38.324,25.511 38.324,25.351 38.453,25.223 v1(38.453,25.092)
  Bottom Layer w0.156: v1(15.923,48.246) 15.923,48.18 16.475,47.628 16.734,47.628 R16.2@16.906,47.457
  other v1: 11.541,2.288
RTC_INT: BTB_3.28 U8.L30 | length 25.7
  Layer 4 w0.102: v1(41.955,16.823) 43.436,15.342 43.436,13.32 43.062,12.947 v1(42.499,12.947)
  Bottom Layer w0.102: v1(39.486,24.989) 39.408,24.989 39.206,24.786 39.206,24.687 38.515,23.996 38.515,23.968 38.485,23.938 38.485,23.65 38.515,23.621 38.515,21.414 39.585,20.345 39.585,18.167 40.804,16.947 41.547,16.947 41.611,16.883 41.896,16.883 v1(41.955,16.823) ; v1(42.499,12.947) 42.499,11.118 46.527,7.089 46.527,4.915 BTB_3.28@46.455,4.843
SARADC_IN0_BOOT: BTB_4.85 C230.1 R62.1 R64.2 R133.2 U8.AM16 | length 156.9
  Top Layer w0.156: R64.2@3.398,59.224 R62.1@4.261,59.224 ; R62.1@4.261,59.307 4.312,59.358 v1@4.312,60.12
  Layer 4 w0.156: v1(4.338,60.094) 6.319,60.094 7.089,60.864 7.089,61.928 7.644,62.483 12.303,62.483 12.61,62.177 33.435,62.177 38.328,57.284 39.252,57.284 39.285,57.318 39.674,57.318 40.367,58.011 v1(40.71,58.011) ; v1(40.434,61.519) 57.915,61.519 58.015,61.419 v1(58.084,61.419)
  Bottom Layer w0.127: 40.431,60.872 40.431,61.516 v1(40.434,61.519) 40.432,61.521 40.432,62.792 BTB_4.85@40.431,62.793
  Bottom Layer w0.156: v1(36.159,41.325) 36.159,41.393 35.946,41.606 35.946,41.624 35.944,41.624 35.808,41.76 35.808,42.441 34.741,43.508 34.741,49.937 40.71,55.906 v1(40.71,58.011) 40.71,60.592 40.431,60.872 ; v1@58.084,61.44 v1(58.084,61.419) 58.084,60.221 68.625,49.68 69.26,49.68 72.275,46.665 72.275,42.896 69.223,39.844 69.223,36.334 68.092,35.202 68.092,33.983 73.578,28.497 73.578,21.105 72.841,20.369 71.851,20.369 62.123,10.64 62.123,5.185 R133.2@61.675,4.737
SARADC_IN2: BTB_4.89 C232.1 R61.1 R63.2 U8.AK16 | length 35.3
  Layer 4 w0.142: v1(38.145,61.186) 38.926,61.186 41.234,58.878 41.234,57.872 39.49,56.128 38.524,56.128 v1(38.505,56.109)
  Bottom Layer w0.142: v1(37.143,40.333) 36.666,39.855 34.378,39.855 33.422,40.812 33.422,45.821 33.734,46.134 33.734,50.672 38.505,55.442 v1(38.505,56.109) ; 37.549,58.843 R63.2@38.323,58.843
  Bottom Layer w0.156: 37.549,58.843 37.549,60.591 v1(38.145,61.186) 38.145,61.265 38.431,61.55 BTB_4.89@38.431,62.793
SARADC_IN3: BTB_4.87 C233.1 R6.1 R17.2 U8.AN17 | length 29.4
  Bottom Layer w0.156: R6.1@34.73,57.97 R17.2@35.614,57.97 36.634,56.95 38.461,56.95 39.062,56.349 ; v1(35.091,41.229) 35.249,41.229 C233.1@35.344,41.325 ; C233.1@35.309,41.289 C233.1@35.344,41.325 ; BTB_4.87@39.431,62.793 39.431,61.078 39.062,60.708 39.062,56.349 ; C233.1@35.344,41.325 35.344,41.426 35.309,41.461 35.309,42.001 34.678,42.632 34.606,42.704 34.225,43.084 34.225,50.668 39.062,55.504 39.062,56.349
SARADC_IN4: BTB_4.86 C234.1 U8.AM17 | length 25
  Bottom Layer w0.127: 39.931,60.833 BTB_4.86@39.931,62.793
  Bottom Layer w0.156: v1(35.56,40.621) 35.57,40.621 35.726,40.777 35.726,41.395 35.56,41.561 35.56,42.207 34.907,42.86 34.483,43.283 34.483,50.296 39.504,55.316 39.504,60.406 39.931,60.833
SDMMC_CLK: BTB_4.49 R53.2 R139.1 | length 25.8
  Top Layer w0.156: v1(47.263,46.895) 47.263,50.914 56.931,60.582 56.931,65.469 v1(56.941,65.479) ; v1@56.916,65.479 56.916,65.533 57.049,65.666 57.049,66.095 R139.1@57.22,66.266
  Bottom Layer w0.156: R53.2@46.603,46.251 47.248,46.895 v1(47.263,46.895) ; BTB_4.49@56.931,66.793 56.936,66.788 56.936,65.484 v1(56.941,65.479)
SDMMC_CLK_R: R53.1 U8.AE1 | length 0.5
  Top Layer w0.156: U8.AE1@46.267,44.856 46.267,44.886 46.59,45.209 v1(46.59,45.238)
SDMMC_CMD: BTB_4.46 R140.1 U8.AE2 | length 30.1
  Top Layer w0.156: U8.AE2@45.807,44.397 45.807,44.864 46.127,45.184 46.127,45.322 46.186,45.381 46.186,45.392 46.342,45.548 46.342,51.967 50.369,55.994 50.84,56.465 50.97,56.465 50.972,56.463 51.097,56.463 51.388,56.754 51.388,56.878 51.297,56.969 51.297,57.094 51.589,57.385 51.713,57.385 51.804,57.294 51.929,57.294 52.22,57.586 52.22,57.71 52.15,57.78 52.15,57.905 52.441,58.196 52.566,58.196 52.636,58.126 52.761,58.126 53.052,58.418 53.052,58.542 52.982,58.612 52.982,58.737 53.273,59.028 53.398,59.028 53.468,58.958 53.593,58.958 53.884,59.25 53.884,59.374 53.793,59.465 53.793,59.59 54.084,59.881 54.209,59.881 54.3,59.79 54.425,59.79 54.716,60.081 54.716,60.206 54.714,60.209 54.714,60.338 55.019,60.644 55.442,61.067 55.442,61.96 55.442,62.038 55.351,62.13 55.29,62.13 55.202,62.218 55.202,62.63 55.29,62.718 55.534,62.718 55.622,62.806 55.622,63.218 55.534,63.306 55.442,63.398 55.442,64.732 55.442,64.987 v1(55.428,65.002) 55.428,65.747 55.332,65.843 55.237,65.843 54.884,66.197 R140.1@54.884,66.292
  Bottom Layer w0.156: v1(55.428,65.002) BTB_4.46@55.427,66.797
SDMMC_D0: BTB_4.47 R145.1 U8.AD2 | length 29.5
  Top Layer w0.156: U8.AD2@46.267,43.937 46.267,44.347 46.407,44.487 46.407,44.529 46.594,44.716 46.637,44.716 46.984,45.064 46.984,45.898 46.6,46.282 46.6,51.551 55.931,60.882 55.931,61.062 55.931,61.14 55.839,61.232 55.825,61.232 55.737,61.32 55.737,61.732 55.825,61.82 56.032,61.82 56.12,61.908 56.12,62.32 56.032,62.408 55.969,62.408 55.88,62.497 55.88,62.908 55.969,62.997 56.032,62.997 56.12,63.085 56.12,63.497 56.032,63.585 55.825,63.585 55.737,63.673 55.737,64.085 55.825,64.173 56.032,64.173 56.12,64.261 56.12,64.673 56.032,64.761 56.022,64.761 55.931,64.853 55.931,65.45 55.931,65.479 v1(55.936,65.484) 55.936,65.563 55.792,65.707 55.792,66.12 R145.1@55.595,66.317
  Bottom Layer w0.156: v1@55.931,65.489 BTB_4.47@55.931,66.793
SDMMC_D1: BTB_4.48 R144.1 U8.AD1 | length 29.8
  Top Layer w0.156: U8.AD1@46.727,44.397 47.242,44.912 47.242,46.005 46.858,46.389 46.858,51.149 53.788,58.079 54.259,58.55 54.389,58.55 54.399,58.54 54.524,58.54 54.815,58.831 54.815,58.956 54.763,59.008 54.763,59.133 55.054,59.424 55.179,59.424 55.231,59.372 55.356,59.372 55.647,59.663 55.647,59.788 55.636,59.798 55.636,59.928 55.87,60.162 56.3,60.591 56.378,60.669 56.378,60.799 56.287,60.891 56.277,60.891 56.189,60.979 56.189,61.391 56.277,61.479 56.584,61.479 56.673,61.567 56.673,61.979 56.584,62.067 56.466,62.067 56.378,62.155 56.378,62.567 56.466,62.656 56.584,62.656 56.673,62.744 56.673,63.156 56.584,63.244 56.466,63.244 56.378,63.332 56.378,63.744 56.466,63.832 56.584,63.832 56.673,63.92 56.673,64.332 56.584,64.42 56.522,64.42 56.431,64.512 56.431,64.983 56.431,64.994 v1(56.433,64.996) 56.433,66.241 R144.1@56.458,66.266
  Bottom Layer w0.156: BTB_4.48@56.431,66.793 56.432,66.792 v1(56.433,64.996) v1(56.433,64.996)
SDMMC_D2: BTB_4.44 R143.1 U8.AF2 | length 30.3
  Top Layer w0.156: U8.AF2@45.348,44.856 45.348,45.364 45.439,45.456 45.48,45.456 45.826,45.802 45.826,53.472 50.365,58.012 50.837,58.483 50.966,58.483 51.005,58.444 51.13,58.444 51.421,58.736 51.421,58.86 51.283,58.999 51.283,59.124 51.574,59.415 51.699,59.415 51.837,59.276 51.962,59.276 52.253,59.567 52.253,59.692 52.114,59.831 52.114,59.956 52.406,60.247 52.53,60.247 52.669,60.108 52.794,60.108 53.085,60.399 53.085,60.524 52.946,60.663 52.946,60.788 53.238,61.079 53.362,61.079 53.501,60.94 53.626,60.94 53.917,61.231 53.917,61.356 53.878,61.395 53.878,61.525 53.984,61.631 54.177,61.824 54.256,61.902 54.256,62.032 54.164,62.123 54.112,62.123 54.023,62.212 54.023,62.623 54.112,62.712 54.34,62.712 54.428,62.8 54.428,63.212 54.34,63.3 54.112,63.3 54.023,63.388 54.023,63.8 54.112,63.888 54.336,63.888 54.428,63.98 54.428,64.661 v1(54.428,65.002) ; R143.1@53.207,66.273 54.426,65.054 v1@54.426,65.002
  Bottom Layer w0.156: v1@54.427,65.003 BTB_4.44@54.427,66.797
SDMMC_D3: BTB_4.45 R141.1 U8.AF1 | length 30
  Top Layer w0.156: U8.AF1@45.807,45.316 45.807,45.355 45.938,45.486 45.938,45.548 46.084,45.694 46.084,52.346 50.966,57.229 51.022,57.284 51.022,57.413 50.897,57.539 50.897,57.663 51.188,57.955 51.313,57.955 51.511,57.756 51.636,57.756 51.927,58.047 51.927,58.172 51.728,58.371 51.728,58.495 52.02,58.786 52.144,58.786 52.343,58.588 52.468,58.588 52.759,58.879 52.759,59.004 52.56,59.202 52.56,59.327 52.852,59.618 52.976,59.618 53.102,59.493 53.231,59.493 53.384,59.646 54.706,60.968 54.706,61.227 54.797,61.318 55.028,61.318 55.14,61.43 55.14,61.661 55.066,61.735 54.897,61.905 54.751,61.905 54.663,61.993 54.663,62.405 54.751,62.493 54.856,62.493 54.944,62.581 54.944,62.993 54.856,63.081 54.774,63.081 54.686,63.17 54.686,63.581 54.774,63.67 55.082,63.67 55.171,63.758 55.171,64.17 55.082,64.258 55.008,64.258 54.917,64.35 54.917,64.898 54.917,65.408 v1@54.957,65.449 ; R141.1@53.842,66.292 54.291,65.843 54.577,65.843 v1(54.936,65.484) v1@54.931,65.479
  Bottom Layer w0.156: v1@54.931,65.489 BTB_4.45@54.931,66.793
SDMMC_DET: BTB_3.26 R146.1 R147.1 U8.P31 | length 32.7
  Top Layer w0.102: v1(45.409,3.325) 45.409,3.231 45.584,3.056 45.584,1.712 45.635,1.662 46.966,1.662 R146.1@47.374,2.07 R147.1@47.374,1.308
  Layer 4 w0.102: v1(41.858,15.169) 42.704,14.323 42.704,14.222 41.932,13.45 v1(41.879,13.45)
  Bottom Layer w0.102: v1(37.423,25.921) 37.397,25.946 37.066,25.946 36.867,25.747 36.659,25.54 36.659,24.673 36.908,24.424 36.908,20.988 38.643,19.253 38.643,17.661 40.741,15.563 41.465,15.563 v1(41.858,15.169) ; v1(41.879,13.45) 41.845,13.415 41.845,10.733 45.752,6.826 45.752,6.322 45.431,6.001 BTB_3.26@45.431,4.843 45.42,4.832 45.42,3.336 v1(45.409,3.325)
TYPEC0_SBU1: BTB_4.81 U8.AL15 | length 24.9
  Bottom Layer w0.156: v1(37.178,41.288) 37.163,41.303 37.163,41.91 36.726,42.348 36.726,42.787 35.779,43.733 35.656,43.857 35.656,48.959 42.431,55.734 42.431,61.269 BTB_4.81@42.431,62.793
TYPEC0_SBU2: BTB_4.82 U8.AM15 | length 24.4
  Top Layer w0.127: v1(36.581,41.963) 36.598,41.946 36.598,41.656 U8.AM15@36.615,41.639
  Bottom Layer w0.156: v1(36.581,41.963) 36.532,42.011 36.532,42.191 36.478,42.245 36.478,42.67 35.597,43.551 35.376,43.771 35.376,49.347 41.931,55.902 BTB_4.82@41.931,62.793
TYPEC0_SSRX1N: BTB_4.7 U8.AP13 | length 29
  Top Layer w0.112: v1(35.891,65.465) 35.891,64.905 35.891,64.634 35.826,64.568 35.704,64.568 35.66,64.525 35.66,64.322 35.704,64.278 35.848,64.278 35.891,64.235 35.891,64.032 35.848,63.988 35.704,63.988 35.66,63.945 35.66,63.742 35.704,63.698 35.826,63.698 35.891,63.632 35.891,63.576 35.891,63.566 35.078,62.753 35.078,57.688 35.078,56.029 35.299,55.807 35.542,55.807 35.624,55.725 35.624,55.344 35.542,55.263 35.121,55.263 34.9,55.041 34.9,54.462 35.121,54.24 35.542,54.24 35.624,54.158 35.624,53.778 35.542,53.696 35.121,53.696 34.9,53.474 34.9,52.895 35.121,52.673 35.542,52.673 35.624,52.592 35.624,52.211 35.542,52.129 35.121,52.129 34.9,51.908 34.9,51.328 35.121,51.107 35.542,51.107 35.624,51.025 35.624,50.644 35.542,50.563 35.299,50.563 35.078,50.341 35.078,49.332 35.078,49.014 35.766,48.326 35.766,44.487 36.582,43.67 36.582,43.51 U8.AP13@36.615,43.477
  Bottom Layer w0.112: v1@35.906,65.479 BTB_4.7@35.906,66.79
TYPEC0_SSRX1P: BTB_4.8 U8.AN13 | length 29
  Top Layer w0.112: v1(36.442,65.491) 36.442,65.44 36.131,65.129 36.131,63.467 35.317,62.654 35.317,57.688 35.317,56.128 35.399,56.046 35.641,56.046 35.863,55.824 35.863,55.245 35.641,55.023 35.221,55.023 35.139,54.942 35.139,54.561 35.221,54.479 35.641,54.479 35.863,54.258 35.863,53.679 35.641,53.457 35.221,53.457 35.139,53.375 35.139,52.994 35.221,52.913 35.641,52.913 35.863,52.691 35.863,52.112 35.641,51.89 35.221,51.89 35.139,51.808 35.139,51.428 35.221,51.346 35.641,51.346 35.863,51.124 35.863,50.545 35.641,50.323 35.399,50.323 35.317,50.242 35.317,49.332 35.317,49.113 36.005,48.425 36.005,44.586 36.912,43.678 36.912,43.554 37.075,43.392 U8.AN13@37.075,43.018
  Bottom Layer w0.112: v1@36.431,65.502 BTB_4.8@36.431,66.793
TYPEC0_SSRX2N: BTB_2.48 U8.AP15 | length 29
  Top Layer w0.112: v1(27.553,65.657) 27.553,65.579 27.721,65.411 27.721,64.65 29.204,63.167 29.363,63.008 29.677,63.008 29.854,63.185 29.969,63.185 30.238,62.916 30.238,62.8 30.062,62.623 30.062,62.31 30.426,61.946 32.984,59.388 32.984,48.781 34.771,46.993 34.771,45.7 34.771,45.189 34.699,45.116 34.63,45.116 34.558,45.044 34.558,44.899 34.63,44.826 34.699,44.826 34.771,44.754 34.771,44.609 34.699,44.536 34.63,44.536 34.558,44.464 34.558,44.319 34.63,44.246 34.699,44.246 34.771,44.174 34.771,44.118 34.771,43.643 35.663,42.751 35.663,42.591 U8.AP15@35.696,42.558
  Bottom Layer w0.112: BTB_2.48@27.551,66.92 27.551,65.977 27.552,65.976 v1(27.553,65.657) v1(27.553,65.657)
TYPEC0_SSRX2P: BTB_2.49 U8.AN15 | length 29
  Top Layer w0.112: v1(28.067,65.657) 28.067,65.576 27.96,65.47 27.96,64.749 29.373,63.337 29.462,63.247 29.578,63.247 29.755,63.424 30.068,63.424 30.478,63.015 30.478,62.701 30.301,62.524 30.301,62.409 30.595,62.115 33.223,59.487 33.223,48.88 35.011,47.092 35.011,43.742 35.993,42.759 35.993,42.311 36.155,42.149 U8.AN15@36.155,42.099
  Bottom Layer w0.112: BTB_2.49@28.051,66.92 28.059,66.912 28.059,65.665 v1(28.067,65.657)
TYPEC0_SSTX1N: BTB_4.6 U8.AN14 | length 28.9
  Top Layer w0.112: v1(35.447,64.92) 35.447,64.84 35.254,64.648 35.254,63.892 34.594,63.231 34.594,60.551 34.594,59.543 34.372,59.321 34.26,59.321 34.178,59.239 34.178,58.859 34.26,58.777 34.372,58.777 34.594,58.555 34.594,58.171 34.594,53.523 34.594,52.875 34.211,52.492 33.943,52.492 33.862,52.41 33.862,52.03 33.943,51.948 34.372,51.948 34.594,51.726 34.594,51.147 34.372,50.925 33.943,50.925 33.862,50.844 33.862,50.463 33.943,50.381 34.372,50.381 34.594,50.16 34.594,49.581 34.372,49.359 34.08,49.359 33.999,49.277 33.999,48.896 34.08,48.815 34.525,48.815 34.821,48.519 35.464,47.876 35.464,44.13 36.453,43.141 36.453,42.771 36.615,42.609 U8.AN14@36.615,42.558
  Bottom Layer w0.112: v1@35.431,64.936 35.431,65.496 BTB_4.6@35.431,66.793
TYPEC0_SSTX1P: BTB_4.5 U8.AP14 | length 29
  Top Layer w0.112: v1(34.915,64.916) 34.915,64.836 35.015,64.736 35.015,64.69 35.015,64.499 34.949,64.433 34.685,64.433 34.642,64.39 34.642,64.186 34.685,64.143 34.949,64.143 35.015,64.077 35.015,64.021 35.015,63.991 34.355,63.33 34.355,60.551 34.355,59.642 34.273,59.56 34.161,59.56 33.939,59.338 33.939,58.759 34.161,58.538 34.273,58.538 34.355,58.456 34.355,58.171 34.355,53.523 34.355,52.974 34.112,52.731 33.844,52.731 33.622,52.51 33.622,51.931 33.844,51.709 34.273,51.709 34.355,51.627 34.355,51.246 34.273,51.165 33.844,51.165 33.622,50.943 33.622,50.364 33.844,50.142 34.273,50.142 34.355,50.06 34.355,49.68 34.273,49.598 33.981,49.598 33.76,49.376 33.76,48.797 33.981,48.575 34.426,48.575 34.482,48.519 35.225,47.777 35.225,44.031 36.084,43.172 36.084,43.14 36.155,43.069 U8.AP14@36.155,43.018
  Bottom Layer w0.112: v1(34.915,64.916) 34.931,64.932 34.931,65.289 BTB_4.5@34.931,66.793
TYPEC0_SSTX2N: BTB_2.47 U8.AN16 | length 29
  Top Layer w0.112: v1(27.121,65.149) 27.121,65.068 27.009,64.955 27.009,64.561 32.496,59.073 32.496,45.337 34.94,42.893 35.534,42.299 35.534,41.975 35.534,41.852 35.696,41.69 U8.AN16@35.696,41.639
  Bottom Layer w0.112: BTB_2.47@27.051,66.92 27.073,66.898 27.073,65.171 27.096,65.149 v1(27.121,65.149)
TYPEC0_SSTX2P: BTB_2.46 U8.AP16 | length 29
  Top Layer w0.112: v1(26.546,65.176) 26.546,65.164 26.769,64.94 26.769,64.462 32.257,58.974 32.257,45.238 32.601,44.894 32.601,44.879 33.787,43.692 34.092,43.387 34.092,43.272 33.958,43.138 33.958,43.023 34.228,42.753 34.343,42.753 34.477,42.887 34.592,42.887 34.632,42.847 35.2,42.279 35.2,42.135 U8.AP16@35.236,42.099
  Bottom Layer w0.112: v1(26.546,65.176) 26.569,65.2 26.569,66.902 BTB_2.46@26.551,66.92
TYPEC0_USB20_OTG_DM: BTB_4.77 R132.2 U8.AM12 | length 24.3
  Bottom Layer w0.112: v1(38.045,42.814) 38.102,42.871 38.287,42.871 38.385,42.969 38.385,43.081 37.896,43.57 37.896,43.588 37.763,43.721 37.763,44.171 36.747,45.187 36.747,48.324 44.561,56.138 44.561,60.894 44.404,61.051 44.404,61.144 44.561,61.301 44.561,61.788 44.419,61.93 v1(44.419,62.634) 44.431,62.646 BTB_4.77@44.431,62.793
TYPEC0_USB20_OTG_DM_R: R131.2 R132.1 | length 37.6
  Top Layer w0.112: R132.1@44.343,63.44 44.602,63.699 44.602,64.22 44.255,64.567 44.255,64.674 43.692,65.236 43.692,65.896 44.012,66.216 51.023,66.216 52.725,67.917 58.382,67.917 59.329,66.971 59.329,60.069 66.314,53.084 66.854,53.084 R131.2@67.209,53.439
TYPEC0_USB20_OTG_DP: BTB_4.76 R130.2 U8.AL12 | length 24.5
  Bottom Layer w0.112: v1(38.4,42.459) 38.457,42.516 38.457,42.702 38.624,42.869 38.624,43.18 38.136,43.669 38.136,43.687 38.003,43.82 38.003,44.27 37.159,45.113 36.987,45.286 36.987,48.225 44.8,56.039 44.8,61.788 44.978,61.965 v1(44.978,62.609) 44.931,62.609 BTB_4.76@44.931,62.793
TYPEC0_USB20_OTG_DP_R: R129.2 R130.1 | length 37.2
  Top Layer w0.112: R130.1@45.079,63.44 44.835,63.684 44.835,64.288 44.468,64.656 44.468,64.762 43.936,65.294 43.936,65.809 44.114,65.987 51.117,65.987 52.819,67.689 58.287,67.689 59.1,66.876 59.1,59.996 66.225,52.87 66.889,52.87 R129.2@67.235,52.525
TYPEC0_USB20_OTG_ID: BTB_4.79 R134.2 U8.AL14 | length 28.8
  Top Layer w0.102: v1(42.893,64.283) 42.893,64.377 42.996,64.481 42.996,64.565 43.484,65.052 43.484,65.769 43.373,65.88 43.373,66.176 R134.2@43.174,66.375
  Bottom Layer w0.156: v1(37.771,41.677) 37.771,41.706 37.475,42.002 37.475,42.784 37.396,42.863 37.396,43.034 36.695,43.735 36.695,43.789 36.342,44.143 36.342,44.295 36.342,48.491 43.431,55.581 43.431,63.668 43.236,63.863 43.236,63.941 v1(42.893,64.283)
TYPEC0_USB20_VBUSDET: BTB_4.80 R135.2 U8.AM14 | length 28.7
  Top Layer w0.102: R135.2@42.406,66.365 42.868,65.903 43.063,65.903 43.281,65.685 43.281,65.137 42.963,64.819 42.895,64.819 42.514,64.438 42.514,63.985 v1(42.931,63.569)
  Top Layer w0.156: U8.AM14@37.075,42.099 37.075,42.137 37.2,42.263 37.2,42.335 37.1,42.434 v1(37.1,42.503)
  Bottom Layer w0.156: v1(37.1,42.503) 37.052,42.551 37.052,42.874 35.961,43.965 35.961,48.626 42.931,55.596 v1(42.931,63.569)
TYPEC1_SBU1: BTB_4.72 U8.AL10 | length 25.1
  Bottom Layer w0.156: v1(39.379,43.566) 39.33,43.615 39.33,43.91 38.998,44.242 38.998,44.778 37.942,45.834 37.942,45.896 37.942,47.869 41.149,51.076 43.722,51.076 44.18,51.534 44.18,52.978 46.931,55.729 BTB_4.72@46.931,62.793
TYPEC1_SBU2: BTB_4.73 U8.AM10 | length 24.6
  Bottom Layer w0.156: v1(38.822,43.812) 38.822,43.839 38.494,44.167 38.494,44.216 38.462,44.248 38.462,44.954 37.731,45.685 37.586,45.83 37.586,47.9 41.021,51.334 43.49,51.334 43.85,51.694 43.85,53.013 46.431,55.594 BTB_4.73@46.431,62.793
TYPEC1_SSRX1N: BTB_4.18 U8.AP8 | length 24.4
  Top Layer w0.112: U8.AP8@38.913,45.776 38.862,45.776 38.791,45.847 38.759,45.847 38.285,46.321 38.285,46.358 38.285,47.267 38.367,47.349 38.381,47.349 38.602,47.571 38.602,48.15 38.381,48.372 38.249,48.372 38.168,48.453 38.168,48.834 38.249,48.916 38.381,48.916 38.602,49.137 38.602,49.717 38.381,49.938 38.367,49.938 38.285,50.02 38.285,50.355 38.285,52.695 38.643,53.053 38.643,54.643 39.107,55.106 39.107,56.515 39.6,57.008 39.6,58.301 41.283,59.984 41.283,62.526 41.283,63.127 41.365,63.208 41.536,63.208 41.617,63.29 41.617,63.671 41.536,63.752 41.365,63.752 41.283,63.834 41.283,64.215 41.365,64.296 41.536,64.296 41.617,64.378 41.617,64.759 41.536,64.841 41.365,64.841 41.283,64.922 41.283,65.078 41.283,65.276 41.442,65.435 v1(41.442,65.491)
  Bottom Layer w0.112: v1@41.431,65.502 BTB_4.18@41.431,66.793
TYPEC1_SSRX1P: BTB_4.17 U8.AN8 | length 24.4
  Top Layer w0.112: U8.AN8@39.373,45.316 39.322,45.316 39.16,45.478 38.79,45.478 38.046,46.222 38.046,46.358 38.046,47.367 38.268,47.588 38.282,47.588 38.363,47.67 38.363,48.051 38.282,48.132 38.15,48.132 37.928,48.354 37.928,48.933 38.15,49.155 38.282,49.155 38.363,49.237 38.363,49.617 38.282,49.699 38.268,49.699 38.046,49.921 38.046,50.355 38.046,52.794 38.404,53.152 38.404,54.742 38.867,55.206 38.867,56.614 39.361,57.107 39.361,58.4 41.044,60.084 41.044,62.526 41.044,65.241 40.885,65.399 v1(40.885,65.455)
  Bottom Layer w0.112: v1(40.885,65.455) 40.906,65.475 BTB_4.17@40.906,66.79